# Altium PCB Driver Main Board-v1.0.PcbDoc (part 5 of 5)
Units mm, origin at the board's own origin, x right, y up, seen from the top; angles counter-clockwise.
Board outline 150 x 100 mm, 4 copper layers (Top Layer, Layer 1, Layer 2, Bottom Layer), stack 1.566 mm thick; 282 components, 222 nets, 936 pads, 397 vias.
Unrouted connection lines stored in the file: 249.
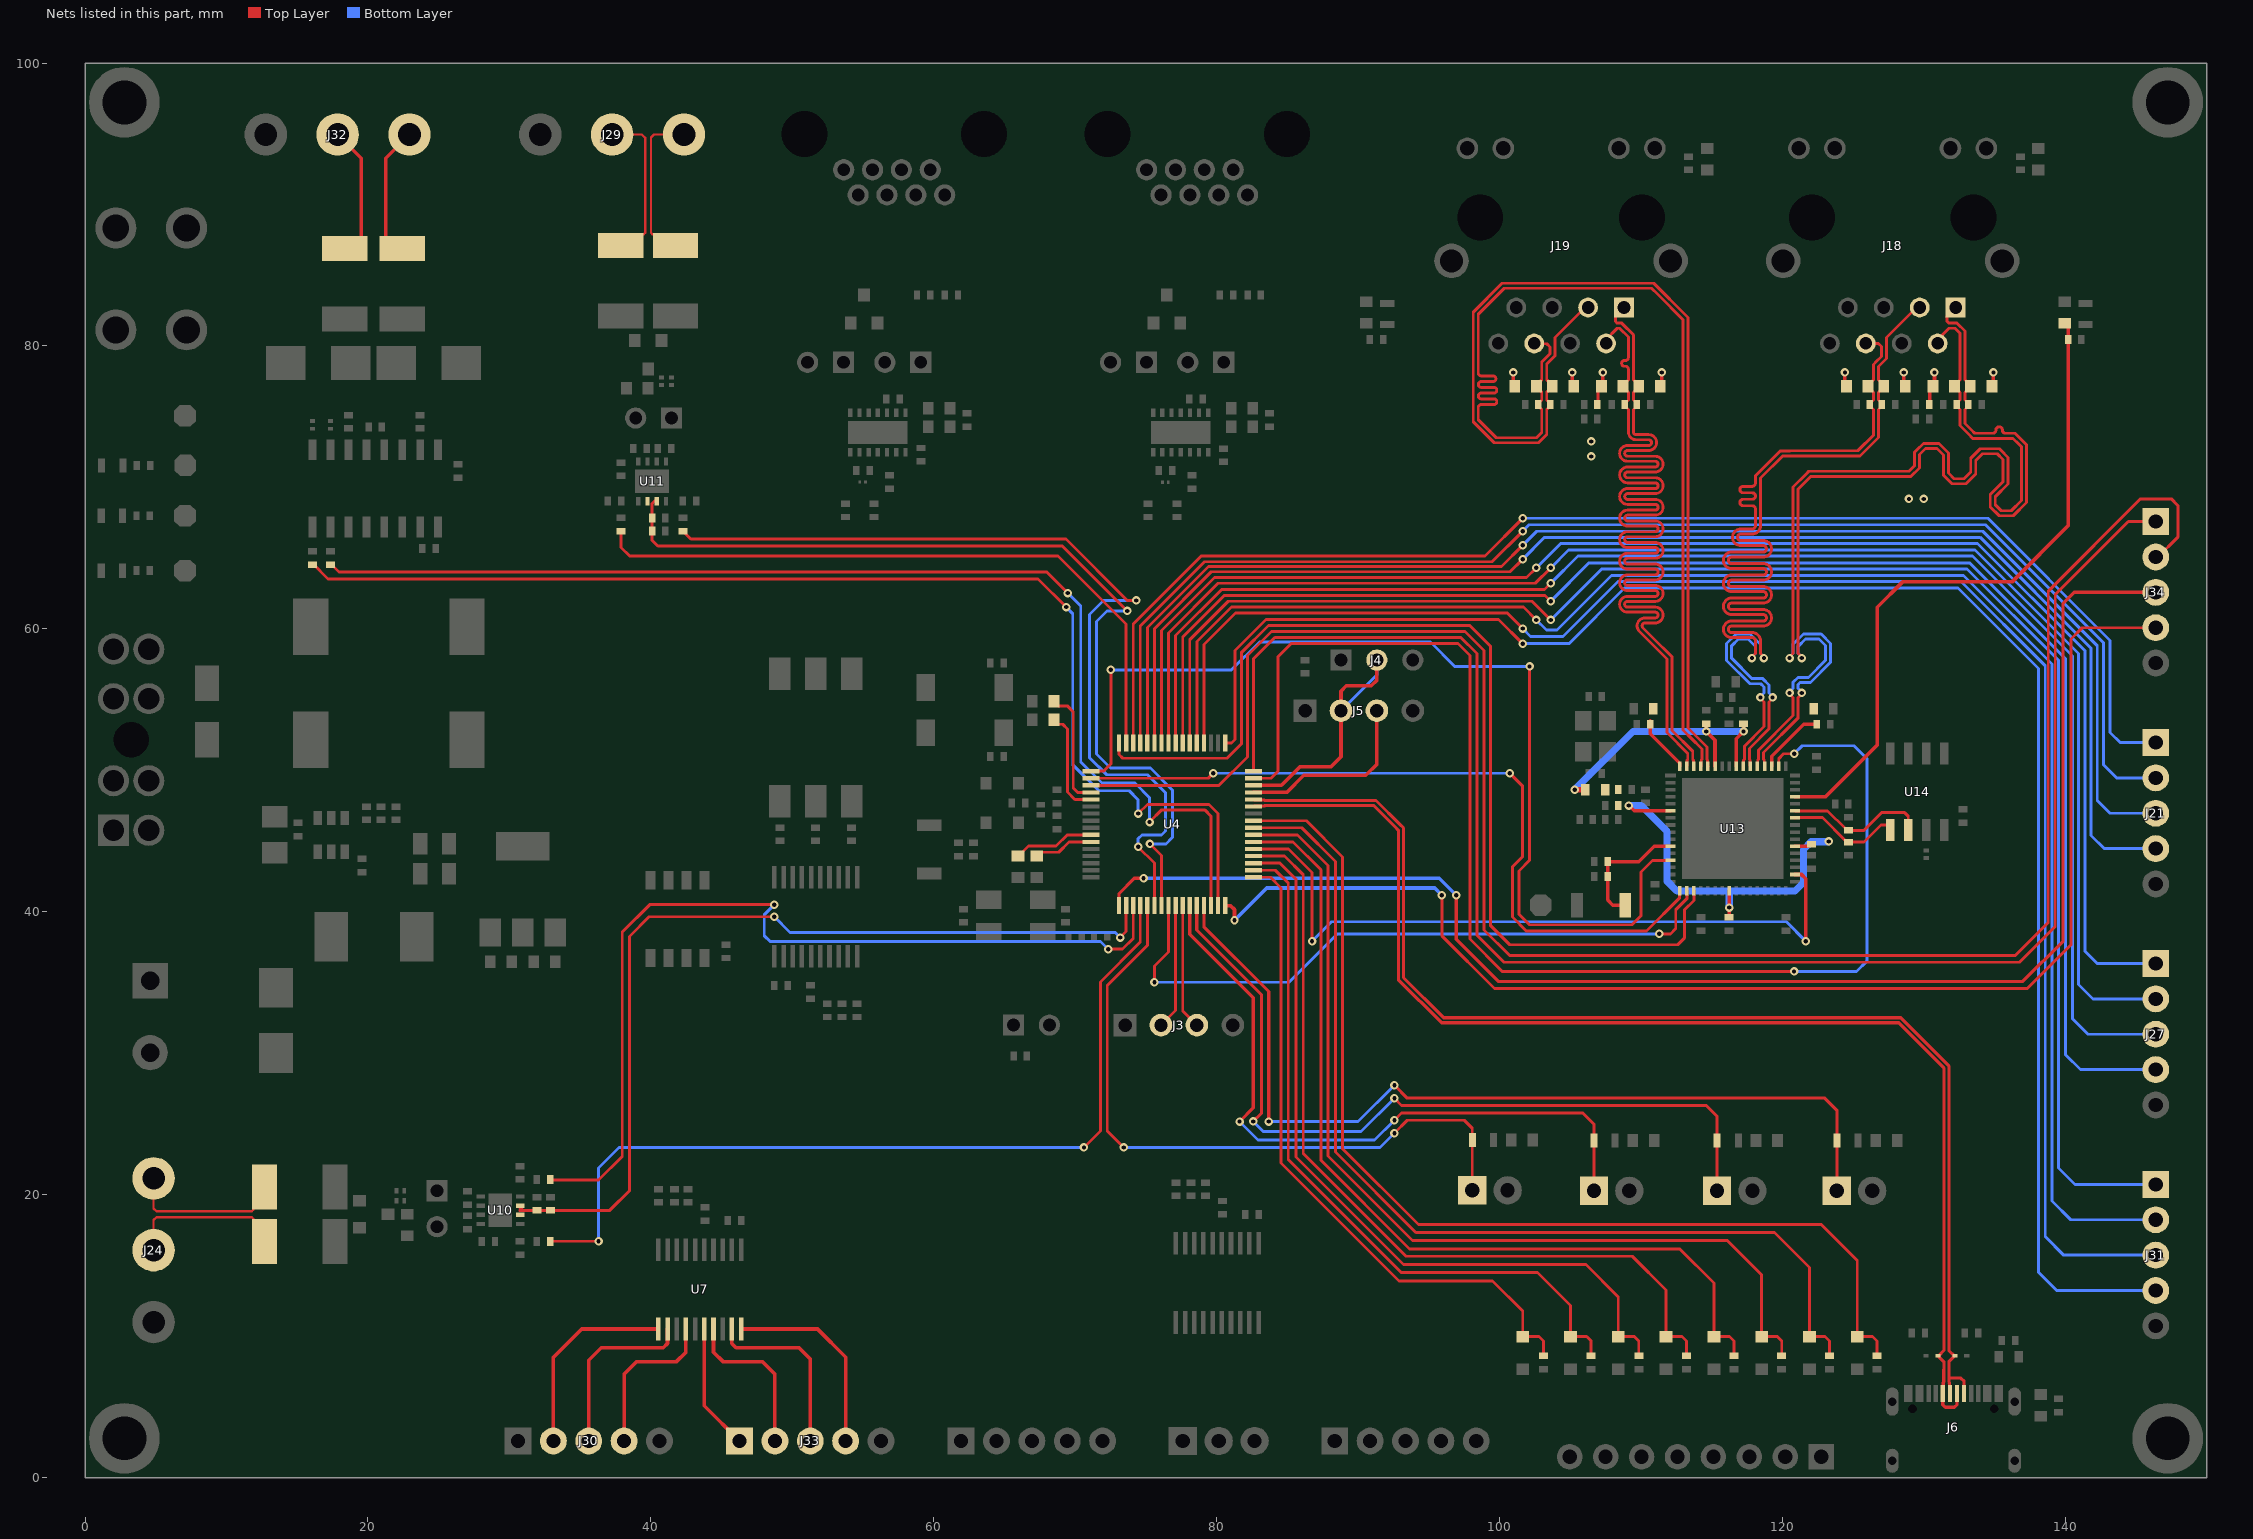
[diagram p5: the nets of this part, all layers, seen from the top]

## Via types
v1: diameter 0.6, hole 0.3, Top Layer to Bottom Layer, 397 vias

## Nets (pads, with @x,y where several pads share a name; then routed paths per layer and width w, separated by ;. In a path a pad name is that pad's centre, name@x,y a point inside that pad or via, vN(x,y) a via of type N, cw(c..) or ccw(c..) an arc to the next point about the centre after c; other vN are vias at no path point) (continued)
OUT3_2: J30.2 U7.11 | length 14.2
  Top Layer w0.254: J30.2@33.104,2.591 33.104,8.492 35.121,10.509 U7.11@40.526,10.509
OUT3_3: J30.3 U7.12 | length 12.8
  Top Layer w0.254: J30.3@35.604,2.591 35.604,8.299 36.497,9.192 40.882,9.192 41.176,9.486 U7.12@41.176,10.509
OUT3_4: J30.4 U7.14 | length 11.4
  Top Layer w0.254: J30.4@38.104,2.591 38.104,7.304 39.004,8.204 41.808,8.204 42.476,8.872 U7.14@42.476,10.509
OUT4_1: J33.1 U7.16 | length 9
  Top Layer w0.254: U7.16@43.776,10.509 43.776,5.084 J33.1@46.269,2.591
OUT4_2: J33.2 U7.17 | length 11.3
  Top Layer w0.254: U7.17@44.426,10.509 44.426,8.872 45.093,8.204 47.869,8.204 48.769,7.304 J33.2@48.769,2.591
OUT4_3: J33.3 U7.19 | length 12.8
  Top Layer w0.254: U7.19@45.726,10.509 45.726,9.486 46.02,9.192 50.468,9.192 51.269,8.392 J33.3@51.269,2.591
OUT4_4: J33.4 U7.20 | length 14.1
  Top Layer w0.254: U7.20@46.376,10.509 51.78,10.509 53.769,8.52 J33.4@53.769,2.591
PA8: D7.1 R37.1 U4.36 | length 59.3
  Top Layer w0.203: U4.36@82.594,43.939 84.8,43.939 86.115,42.624 86.115,22.924 93.389,15.65 109.373,15.65 111.765,13.259 D7.1@111.765,9.968 ; D7.1@111.775,9.968 112.885,9.968 113.203,9.65 R37.1@113.203,8.607
PB13: D4.1 R40.1 U4.33 | length 47.5
  Top Layer w0.203: U4.33@82.594,42.439 83.794,42.439 84.551,41.682 84.551,22.233 92.874,13.911 99.497,13.911 101.63,11.778 D4.1@101.63,9.968 ; D4.1@101.674,9.968 102.783,9.968 103.101,9.65 R40.1@103.101,8.607
PB14: D5.1 R39.1 U4.34 | length 51.4
  Top Layer w0.203: U4.34@82.594,42.939 84.139,42.939 85.051,42.028 85.051,22.496 93.043,14.504 102.683,14.504 105.008,12.178 D5.1@105.008,9.968 ; D5.1@105.041,9.968 106.151,9.968 106.468,9.65 R39.1@106.468,8.607
PB15: D6.1 R38.1 U4.35 | length 55.4
  Top Layer w0.203: U4.35@82.594,43.439 84.454,43.439 85.594,42.3 85.594,22.668 93.2,15.061 106.099,15.061 108.386,12.773 D6.1@108.386,9.968 ; D6.1@108.408,9.968 109.518,9.968 109.835,9.65 R38.1@109.835,8.607
PC6: D8.1 R36.1 U4.38 | length 63.9
  Top Layer w0.203: U4.38@82.594,44.939 85.387,44.939 87.361,42.966 87.361,22.433 93.622,16.171 112.728,16.171 115.143,13.756 D8.1@115.143,9.968 116.253,9.968 116.57,9.65 R36.1@116.57,8.607
PC7: D9.1 R35.1 U4.39 | length 67.8
  Top Layer w0.203: U4.39@82.594,45.439 85.703,45.439 87.871,43.271 87.871,22.732 93.845,16.758 116.089,16.758 118.521,14.326 D9.1@118.521,9.968 119.62,9.968 119.937,9.65 R35.1@119.937,8.607
PC14-OSC32_IN: R7.2 U4.4 | length 8.4
  Top Layer w0.203: R7.2@68.488,54.876 68.488,54.838 68.767,54.559 69.435,54.559 69.859,54.134 69.859,48.75 70.171,48.439 U4.4@71.095,48.439
PC15-OSC32_OUT: R8.2 U4.5 | length 7.6
  Top Layer w0.203: R8.2@68.488,53.581 68.488,53.533 68.767,53.254 69.109,53.254 69.444,52.919 69.444,48.462 69.967,47.939 U4.5@71.095,47.939
PD8: D10.1 R34.1 U4.40 | length 71.7
  Top Layer w0.203: U4.40@82.594,45.939 86.01,45.939 88.385,43.564 88.385,23.015 94.073,17.327 119.435,17.327 121.899,14.862 D10.1@121.899,9.968 122.987,9.968 123.305,9.65 R34.1@123.305,8.607
PD9: D12.1 R33.1 U4.41 | length 75.6
  Top Layer w0.203: U4.41@82.594,46.439 86.333,46.439 88.894,43.878 88.894,23.253 94.263,17.884 122.734,17.884 125.277,15.34 D12.1@125.277,9.968 126.355,9.968 126.672,9.65 R33.1@126.672,8.607
PF0-OSC_IN: R9.2 U4.10 | length 5.8
  Top Layer w0.203: R9.2@65.927,43.939 65.991,43.939 66.692,44.64 68.627,44.64 69.426,45.439 U4.10@71.095,45.439
PF1-OSC_OUT: R10.2 U4.11 | length 4.2
  Top Layer w0.203: R10.2@67.274,43.939 67.541,44.207 68.83,44.207 69.562,44.939 U4.11@71.095,44.939
PWM1_1: J21.1 U4.62 | length 94.2
  Top Layer w0.203: U4.62@74.094,51.939 74.094,60.342 78.903,65.151 98.958,65.151 v1(101.625,67.818)
  Bottom Layer w0.203: v1(101.625,67.818) 134.525,67.818 143.154,59.189 143.154,52.675 143.866,51.963 J21.1@146.38,51.963
PWM1_2: J21.2 U4.61 | length 95.5
  Top Layer w0.203: U4.61@74.595,51.939 74.595,60.205 79.134,64.745 99.466,64.745 v1(101.625,66.904)
  Bottom Layer w0.203: v1(101.625,66.904) 102.083,67.361 134.336,67.361 142.697,58.999 142.697,50.387 143.62,49.463 J21.2@146.38,49.463
PWM1_3: J21.3 U4.60 | length 96.9
  Top Layer w0.203: U4.60@75.094,51.939 75.094,60.095 79.414,64.414 100.127,64.414 v1(101.625,65.913)
  Bottom Layer w0.203: v1(101.625,65.913) 102.616,66.904 134.146,66.904 142.24,58.81 142.24,47.862 143.138,46.963 J21.3@146.38,46.963
PWM1_4: J21.4 U4.59 | length 98.4
  Top Layer w0.203: U4.59@75.595,51.939 75.595,60.011 79.617,64.033 100.736,64.033 v1(101.625,64.922)
  Bottom Layer w0.203: v1(101.625,64.922) 103.175,66.472 133.968,66.472 141.808,58.631 141.808,45.388 142.733,44.463 J21.4@146.38,44.463
PWM2_1: J27.1 U4.58 | length 105.5
  Top Layer w0.203: U4.58@76.094,51.939 76.094,59.876 79.845,63.627 101.905,63.627 v1(102.591,64.313)
  Bottom Layer w0.203: v1(102.591,64.313) 104.318,66.04 133.789,66.04 141.376,58.452 141.376,37.213 142.245,36.345 J27.1@146.38,36.345
PWM2_2: J27.2 U4.57 | length 106.8
  Top Layer w0.203: U4.57@76.595,51.939 76.595,59.716 80.099,63.221 102.514,63.221 v1(103.607,64.313)
  Bottom Layer w0.203: v1(103.607,64.313) 104.877,65.583 133.599,65.583 140.919,58.263 140.919,34.858 141.933,33.845 J27.2@146.38,33.845
PWM2_3: J27.3 U4.56 | length 108.2
  Top Layer w0.203: U4.56@77.094,51.939 77.094,59.53 80.353,62.789 103.175,62.789 v1(103.607,63.221)
  Bottom Layer w0.203: v1(103.607,63.221) 105.537,65.151 133.421,65.151 140.487,58.084 140.487,32.436 141.578,31.345 J27.3@146.38,31.345
PWM2_4: J27.4 U4.55 | length 110
  Top Layer w0.203: U4.55@77.595,51.939 77.595,59.42 80.531,62.357 103.2,62.357 v1(103.607,61.951)
  Bottom Layer w0.203: v1(103.607,61.951) 106.324,64.668 133.221,64.668 140.005,57.884 140.005,29.896 141.056,28.845 J27.4@146.38,28.845
PWM3_1: J31.1 U4.54 | length 117.8
  Top Layer w0.203: U4.54@78.094,51.939 78.094,59.234 80.811,61.951 102.286,61.951 v1(103.607,60.63)
  Bottom Layer w0.203: v1(103.607,60.63) 107.213,64.237 133.042,64.237 139.501,57.777 139.501,21.893 140.668,20.726 J31.1@146.38,20.726
PWM3_2: J31.2 U4.53 | length 119.3
  Top Layer w0.203: U4.53@78.595,51.939 78.595,59.099 81.039,61.544 101.676,61.544 v1(102.591,60.63)
  Bottom Layer w0.203: v1(102.591,60.63) 103.302,59.919 104.064,59.919 107.914,63.769 132.795,63.769 139.04,57.525 139.04,19.55 140.364,18.226 J31.2@146.38,18.226
PWM3_3: J31.3 U4.52 | length 120.8
  Top Layer w0.203: U4.52@79.094,51.939 79.094,58.888 81.319,61.112 100.533,61.112 v1(101.625,60.02)
  Bottom Layer w0.203: v1(101.625,60.02) 102.184,59.461 104.483,59.461 108.359,63.337 132.616,63.337 138.565,57.389 138.565,17.036 139.874,15.726 J31.3@146.38,15.726
PWM3_4: J31.4 U4.49 | length 121
  Top Layer w0.203: U4.49@80.595,51.939 81.047,51.939 81.295,52.187 81.295,58.466 83.491,60.662 99.917,60.662 v1(101.625,58.953)
  Bottom Layer w0.203: v1(101.625,58.953) 104.9,58.953 108.829,62.883 132.405,62.883 138.089,57.199 138.089,14.518 139.38,13.226 J31.4@146.38,13.226
PWM4_1: J34.1 U4.48 | length 120.2
  Top Layer w0.203: U4.48@82.594,49.939 82.594,57.888 84.105,59.399 97.254,59.399 98.4,58.253 98.4,38.341 100.306,36.435 136.744,36.435 139.277,38.968 139.277,62.419 144.44,67.582 J34.1@146.38,67.582
PWM4_2: J34.2 U4.3 | length 138.3
  Top Layer w0.203: U4.3@71.095,48.939 80.155,48.939 82.169,50.953 82.169,58.108 83.865,59.804 97.558,59.804 98.896,58.466 98.896,38.713 100.686,36.922 136.461,36.922 138.775,39.236 138.775,62.663 145.304,69.193 147.47,69.193 147.94,68.723 147.94,66.482 146.54,65.082 J34.2@146.38,65.082
PWM4_3: J34.3 U4.17 | length 104.8
  Top Layer w0.229: U4.17@73.094,40.439 73.094,41.294 74.168,42.367 v1(74.828,42.367) ; v1(96.926,41.173) 96.926,38.049 99.899,35.076 136.981,35.076 139.827,37.922 139.827,61.798 140.611,62.582 J34.3@146.38,62.582
  Bottom Layer w0.229: v1(74.828,42.367) 95.732,42.367 v1(96.926,41.173)
PWM4_4: J34.4 U4.32 | length 95.5
  Top Layer w0.203: v1(95.91,41.173) 95.91,38.311 99.645,34.576 137.296,34.576 140.386,37.667 140.386,59.284 141.184,60.082 J34.4@146.38,60.082
  Top Layer w0.254: U4.32@80.595,40.439 80.599,40.435 80.977,40.435 81.255,40.157 v1(81.255,39.395)
  Bottom Layer w0.254: v1(81.255,39.395) 83.541,41.682 95.402,41.682 v1(95.91,41.173)
RE/DE/RS485/T: R66.1 R68.1 U4.18 U10.2 U10.3 | length 65
  Top Layer w0.203: 30.725,18.896 30.943,18.896 31.93,18.896 R66.1@31.938,18.888 ; R66.1@31.945,18.896 R68.1@32.887,18.896 37.094,18.896 38.478,20.281 38.478,38.256 39.871,39.648 v1@48.726,39.648 ; v1(73.179,38.181) 73.595,38.597 U4.18@73.595,40.439
  Top Layer w0.254: U10.3@30.758,19.226 30.758,19.082 30.943,18.896 ; R66.1@31.93,18.896 R66.1@31.945,18.896
  Bottom Layer w0.203: v1(48.726,39.647) 49.842,38.532 52.252,38.532 72.828,38.532 v1(73.179,38.181)
RE/DE/RS485/T-2: R67.1 R69.1 U4.23 U11.2 U11.3 | length 66.8
  Top Layer w0.203: U11.3@40.41,69.031 40.265,69.031 40.08,68.845 R67.1@40.08,67.843 R69.1@40.08,66.902 40.08,66.266 40.49,65.856 69.083,65.856 v1(73.674,61.265) ; v1(75.273,44.795) 76.094,43.974 U4.23@76.094,40.439
  Bottom Layer w0.203: v1(73.674,61.265) 72.249,61.265 71.495,60.511 71.495,51.162 72.488,50.168 75.308,50.168 76.86,48.616 76.86,45.246 76.41,44.795 v1(75.273,44.795)
RS232_RX: F5.1 J32.1 | length 9.5
  Top Layer w0.254: F5.1@22.427,86.893 22.021,86.893 21.258,87.656 21.258,93.269 J32.1@22.935,94.945
RS232_TX: F6.1 J32.2 | length 9.5
  Top Layer w0.254: J32.2@17.855,94.945 19.531,93.269 19.531,87.656 18.768,86.893 F6.1@18.363,86.893
RS485-2_N: F3.2 J29.2 | length 11.2
  Top Layer w0.165: J29.2@37.26,94.945 39.358,94.945 39.591,94.713 39.591,88.001 39.494,87.904 38.677,87.904 F3.2@37.87,87.097
RS485-2_P: F4.2 J29.1 | length 11.2
  Top Layer w0.165: F4.2@41.731,87.097 40.923,87.904 40.107,87.904 40.01,88.001 40.01,94.727 40.228,94.945 J29.1@42.34,94.945
RS485_N: F1.2 J24.2 | length 11.3
  Top Layer w0.165: J24.2@4.844,16.076 4.844,18.203 5.047,18.407 11.788,18.407 11.885,18.31 11.885,17.493 F1.2@12.692,16.686
RS485_P: F2.2 J24.1 | length 11.2
  Top Layer w0.165: J24.1@4.844,21.156 4.844,19.031 5.049,18.826 11.788,18.826 11.885,18.923 11.885,19.739 F2.2@12.692,20.547
RST#: C43.2 R92.2 SW3.2 U13.11 | length 9
  Top Layer w0.254: SW3.2@108.865,40.468 108.004,40.468 107.635,40.837 C43.2@107.635,42.5 R92.2@107.635,43.542 109.84,43.542 110.934,44.635 U13.11@112.074,44.635
RUNLED: R106.1 R107.2 U13.45 | length 47.4
  Top Layer w0.254: U13.45@120.874,48.135 123.038,48.135 126.695,51.792 126.695,61.533 128.479,63.317 136.218,63.317 140.182,67.281 R106.1@140.182,80.447 140.182,81.357 R107.2@139.94,81.598
RXA_N: C57.2 J18.6 R93.1 U13.54 | length 72.3
  Top Layer w0.203: U13.54@117.724,50.285 117.7,50.309 117.7,50.715 117.652,50.764 117.652,51.554 119.04,52.942 119.04,54.835 119.289,55.084 v1(119.289,55.153) ; v1(117.831,57.937) 117.831,58.006 118.079,58.255 118.079,58.877 118.079,59.157 ccw(c117.851,59.157) 117.851,59.385 116.398,59.385 cw(c116.398,59.969) 116.398,60.554 118.632,60.554 ccw(c118.632,60.782) 118.632,61.011 116.398,61.011 cw(c116.398,61.595) 116.398,62.179 118.632,62.179 ccw(c118.632,62.408) 118.632,62.636 116.398,62.636 cw(c116.398,63.221) 116.398,63.805 118.632,63.805 ccw(c118.632,64.033) 118.632,64.262 116.398,64.262 cw(c116.398,64.846) 116.398,65.43 118.632,65.43 ccw(c118.632,65.659) 118.632,65.888 117.042,65.888 cw(c117.042,66.472) 117.042,67.056 117.851,67.056 ccw(c117.851,67.285) 118.079,67.285 118.079,68.019 118.079,68.374 118.079,68.476 ccw(c117.851,68.476) 117.851,68.704 117.211,68.704 cw(c117.211,68.933) 117.211,69.162 117.851,69.162 ccw(c117.851,69.39) 117.851,69.619 117.211,69.619 cw(c117.211,69.847) 117.211,70.076 117.851,70.076 ccw(c117.851,70.305) 118.079,70.305 118.079,70.808 118.094,70.822 119.858,72.586 120.068,72.586 120.527,72.587 125.23,72.587 125.316,72.587 126.415,73.686 126.415,75.514 126.173,75.755 C57.2@126.173,75.844 126.173,75.933 126.415,76.175 126.415,76.72 126.033,77.102 R93.1@126.033,77.165 126.033,77.229 126.415,77.61 126.415,78.689 126.623,78.898 126.986,79.261 126.986,79.953 126.766,80.173 125.885,80.173 J18.6@125.882,80.176
  Bottom Layer w0.203: v1(117.831,57.937) 117.831,58.006 118.08,58.255 118.08,58.755 117.551,59.284 116.877,59.284 116.401,58.807 116.401,57.922 117.843,56.479 118.6,56.479 119.04,56.04 119.04,55.47 119.289,55.221 v1(119.289,55.153)
RXA_P: C59.2 J18.3 R95.1 U13.55 | length 72.6
  Top Layer w0.203: U13.55@117.224,50.285 117.247,50.309 117.247,50.715 117.296,50.764 117.296,51.701 118.684,53.09 118.684,54.835 118.435,55.084 v1(118.435,55.153) ; v1(118.685,57.937) 118.685,58.005 118.435,58.255 118.435,58.877 118.435,59.157 ccw(c117.851,59.157) 117.851,59.741 116.398,59.741 cw(c116.398,59.969) 116.398,60.198 118.632,60.198 ccw(c118.632,60.782) 118.632,61.366 116.398,61.366 cw(c116.398,61.595) 116.398,61.824 118.632,61.824 ccw(c118.632,62.408) 118.632,62.992 116.398,62.992 cw(c116.398,63.221) 116.398,63.449 118.632,63.449 ccw(c118.632,64.033) 118.632,64.618 116.398,64.618 cw(c116.398,64.846) 116.398,65.075 118.632,65.075 ccw(c118.632,65.659) 118.632,66.243 117.042,66.243 cw(c117.042,66.472) 117.042,66.7 117.851,66.7 ccw(c117.851,67.285) 118.435,67.285 118.435,68.019 118.435,70.66 120.006,72.231 125.463,72.231 126.77,73.538 126.77,75.514 127.012,75.755 C59.2@127.012,75.844 127.012,75.933 126.77,76.175 126.77,76.72 127.152,77.102 R95.1@127.152,77.165 127.152,77.229 126.77,77.61 126.77,78.542 127.342,79.114 127.342,80.588 129.47,82.716 J18.3@129.692,82.716
  Bottom Layer w0.203: v1(118.435,55.153) 118.435,55.221 118.684,55.47 118.684,55.893 118.453,56.124 117.695,56.124 116.045,57.774 116.045,58.955 116.729,59.639 117.698,59.639 118.435,58.902 118.435,58.255 118.685,58.006 v1(118.685,57.937)
RXB_N: C58.2 J19.6 R94.1 U13.61 | length 75.6
  Top Layer w0.203: J19.6@102.442,80.176 102.467,80.151 103.327,80.151 103.558,79.92 103.558,79.448 103.183,79.074 102.975,78.865 102.975,77.61 102.594,77.229 R94.1@102.594,77.165 102.594,77.102 102.975,76.72 102.975,76.175 102.733,75.933 C58.2@102.733,75.844 102.733,75.755 102.975,75.514 102.975,73.891 102.594,73.51 99.76,73.51 98.484,74.786 98.484,75.143 98.484,75.651 cw(c98.687,75.651) 98.687,75.854 99.593,75.854 ccw(c99.593,76.057) 99.593,76.26 98.687,76.26 cw(c98.687,76.464) 98.687,76.667 99.593,76.667 ccw(c99.593,76.87) 99.593,77.073 98.687,77.073 cw(c98.687,77.276) 98.687,77.48 99.528,77.48 ccw(c99.528,77.683) 99.528,77.886 98.687,77.886 cw(c98.687,78.089) 98.484,78.089 98.484,79.102 98.484,82.236 100.322,84.074 110.744,84.074 111.15,83.668 112.964,81.854 112.964,52.842 113.068,52.738 113.504,52.301 114.296,51.509 114.296,50.764 114.247,50.715 114.247,50.309 U13.61@114.224,50.285
RXB_P: C60.2 J19.3 R96.1 U13.60 | length 75.6
  Top Layer w0.203: J19.3@106.252,82.716 106.03,82.716 103.913,80.599 103.913,79.301 103.331,78.718 103.33,77.61 103.712,77.229 R96.1@103.712,77.165 ; U13.60@114.724,50.285 114.7,50.309 114.7,50.715 114.652,50.764 114.652,51.657 113.319,52.989 113.319,82.002 113.215,82.106 110.891,84.43 100.174,84.43 98.129,82.384 98.129,74.638 99.612,73.155 102.741,73.155 103.33,73.744 103.33,75.514 C60.2@103.572,75.755 ; 103.33,76.175 103.33,76.72 ; 103.33,76.175 C60.2@103.572,75.933 ; 103.33,76.175 103.33,76.72 ; 103.33,76.175 C60.2@103.572,75.933 ; 103.33,76.72 R96.1@103.712,77.102 ; 103.33,76.72 R96.1@103.712,77.102 ; C60.2@103.572,75.755 C60.2@103.572,75.844 ; C60.2@103.572,75.755 C60.2@103.572,75.844 ; C60.2@103.572,75.844 C60.2@103.572,75.933 ; C60.2@103.572,75.844 C60.2@103.572,75.933 ; R96.1@103.712,77.102 R96.1@103.712,77.165 ; R96.1@103.712,77.102 R96.1@103.712,77.165
RXD/RS232: R85.2 U4.31 | length 85.1
  Top Layer w0.203: R85.2@16.139,64.565 17.179,63.525 67.369,63.525 v1(69.356,61.538) ; v1(74.445,46.939) 75.094,47.589 79.445,47.589 80.094,46.939 U4.31@80.094,40.439
  Bottom Layer w0.203: v1(69.356,61.538) 69.825,61.07 69.825,50.395 71.665,48.554 73.812,48.554 74.445,47.922 v1(74.445,46.939)
RXD/RS485: R61.1 U4.19 | length 64.8
  Top Layer w0.203: R61.1@32.885,21.08 32.934,21.031 36.297,21.031 37.973,22.708 37.973,38.561 39.914,40.502 v1(48.726,40.502) ; v1(72.322,37.36) 73.339,37.36 74.094,38.116 U4.19@74.094,40.439
  Bottom Layer w0.203: v1(48.726,40.502) 48.017,39.793 48.017,38.311 48.435,37.892 51.244,37.892 71.79,37.892 v1(72.322,37.36)
RXD/RS485-2: R63.1 U4.22 | length 64.4
  Top Layer w0.203: R63.1@42.264,66.904 42.823,66.345 69.336,66.345 73.674,62.007 v1(74.314,62.007) ; v1(74.445,44.589) 75.595,43.439 U4.22@75.595,40.439
  Bottom Layer w0.203: v1(74.314,62.007) 72.002,62.007 71.012,61.018 71.012,50.892 72.219,49.686 75.108,49.686 76.378,48.416 76.378,45.718 76.094,45.435 74.716,45.435 74.445,45.163 v1(74.445,44.589)
SCL: R87.1 U13.43 U14.6 | length 10.2
  Top Layer w0.203: U13.43@120.874,47.135 123.183,47.135 124.436,45.883 124.526,45.883 R87.1@124.653,45.756 125.741,45.756 126.992,47.006 128.63,47.006 128.882,46.754 U14.6@128.882,45.782
SDA: R86.1 U13.42 U14.5 | length 8.3
  Top Layer w0.203: U13.42@120.874,46.635 120.895,46.656 122.81,46.656 124.41,45.056 124.526,45.056 R86.1@124.653,44.929 ; R86.1@124.564,44.929 125.746,44.929 126.96,46.143 127.404,46.143 127.612,45.935 U14.5@127.612,45.782
SPI3_CS: U4.47 U13.50 | length 95.5
  Top Layer w0.203: U4.47@82.594,49.439 83.828,49.439 84.328,49.939 84.328,58.026 85.262,58.96 97.048,58.96 97.892,58.117 97.892,38.076 100.186,35.782 v1(120.807,35.782) ; U13.50@119.724,50.285 119.724,50.821 120.073,51.17 v1(120.817,51.17)
  Bottom Layer w0.203: v1(120.807,35.782) 125.228,35.782 125.955,36.509 125.955,50.829 125.044,51.74 121.387,51.74 v1(120.817,51.17)
SPI3_MISO: U4.1 U13.13 | length 72
  Top Layer w0.203: U4.1@71.095,49.939 72.001,49.939 72.513,50.451 v1(72.513,57.105) ; v1(102.115,57.346) 102.115,43.637 101.371,42.894 101.371,39.827 102.115,39.084 109.352,39.084 109.985,39.717 109.985,42.824 110.796,43.635 U13.13@112.074,43.635
  Bottom Layer w0.203: v1(72.513,57.105) 81.051,57.105 83.015,59.068 95.104,59.068 96.825,57.346 v1(102.115,57.346)
SPI3_MOSI: U4.2 U13.17 | length 54.3
  Top Layer w0.203: U4.2@71.095,49.439 79.394,49.439 v1(79.745,49.789) ; v1(100.711,49.789) 101.627,48.874 101.627,43.904 100.907,43.184 100.907,39.621 101.882,38.646 110.382,38.646 112.724,40.987 U13.17@112.724,41.485 ; U13.17@112.718,41.48 U13.17@112.724,41.485 ; U13.17@112.729,41.491 U13.17@112.724,41.485
  Bottom Layer w0.203: v1(79.745,49.789) v1(100.711,49.789)
SPI3_SCK: U4.64 U13.19 | length 73.3
  Top Layer w0.203: U4.64@73.094,51.939 73.094,51.121 73.36,50.855 80.724,50.855 81.737,51.869 81.737,58.314 83.652,60.229 97.886,60.229 99.364,58.751 99.364,39.017 100.714,37.668 112.585,37.668 113.052,38.135 113.052,40.123 113.729,40.8 U13.19@113.729,41.491
SW_CLK/BOOT0: J4.2 J5.2 U4.46 | length 20.5
  Top Layer w0.254: U4.46@82.594,48.939 84.571,48.939 85.872,50.241 88.066,50.241 88.782,50.957 J5.2@88.782,54.216 88.782,55.587 89.163,55.968 90.923,55.968 91.322,56.368 J4.2@91.322,57.695
  Bottom Layer w0.203: J5.2@88.782,54.216 91.322,56.756 J4.2@91.322,57.797
SW_DIO: J5.3 U4.45 | length 13.3
  Top Layer w0.254: U4.45@82.594,48.439 84.942,48.439 86.149,49.646 90.542,49.646 91.322,50.426 J5.3@91.322,54.216
SYNC0: U4.37 U13.34 | length 51.9
  Top Layer w0.203: U4.37@82.594,44.439 85.071,44.439 86.739,42.771 v1(86.739,37.922)
  Top Layer w0.254: U13.34@120.874,42.635 121.33,42.635 121.631,42.334 ; U13.34@120.879,42.641 121.336,42.641 121.637,42.34 v1@121.637,37.922
  Bottom Layer w0.203: v1(86.739,37.922) 88.112,39.296 120.267,39.296 v1(121.641,37.922)
SYNC1: U4.24 U13.18 | length 47.3
  Top Layer w0.203: v1(75.595,35.023) 75.595,36.164 76.595,37.164 U4.24@76.595,40.439 ; v1(111.284,38.44) 112.074,38.44 112.451,38.817 112.451,40.145 113.229,40.923 U13.18@113.229,41.491
  Bottom Layer w0.203: v1(75.595,35.023) 85.103,35.023 88.52,38.44 v1(111.284,38.44)
TXA_N: C61.2 J18.2 R98.1 U13.52 | length 72.6
  Top Layer w0.203: U13.52@118.724,50.285 118.7,50.309 118.7,50.715 118.652,50.764 118.652,51.268 121.101,53.717 121.101,55.153 121.35,55.402 v1(121.35,55.47) ; v1(120.496,57.937) 120.496,58.006 120.745,58.255 120.745,70.032 121.643,70.93 121.852,71.138 128.928,71.138 129.313,71.523 129.313,72.462 129.521,72.67 129.952,73.101 131.06,73.101 131.523,72.638 131.731,72.429 131.731,71.007 132.124,70.614 132.815,70.614 133.298,71.096 133.298,72.055 133.975,72.732 135.325,72.732 135.429,72.628 135.939,72.118 135.939,70.247 135.036,69.344 135.036,68.772 135.457,68.351 136.163,68.351 136.882,69.071 136.882,72.872 136.691,73.063 136.286,73.468 133.441,73.468 133.11,73.8 132.536,74.374 132.536,75.514 132.295,75.755 C61.2@132.295,75.844 132.295,75.933 132.536,76.175 132.536,76.721 132.155,77.102 R98.1@132.155,77.165 132.155,77.229 132.536,77.61 132.536,80.9 132.183,81.253 131.753,81.253 130.962,80.461 J18.2@130.962,80.176
  Bottom Layer w0.203: v1(120.496,57.937) 120.496,58.006 120.745,58.255 120.745,58.917 121.468,59.639 122.728,59.639 123.393,58.974 123.393,57.638 121.97,56.215 121.241,56.215 121.101,56.075 121.101,55.788 121.35,55.538 v1(121.35,55.47)
TXA_P: C63.2 J18.1 R100.1 U13.53 | length 72.5
  Top Layer w0.203: U13.53@118.224,50.285 118.247,50.309 118.247,50.715 118.296,50.764 118.296,51.415 120.745,53.865 120.745,55.153 120.496,55.402 v1(120.496,55.47) ; v1(121.35,57.937) 121.35,58.006 121.101,58.255 121.101,69.885 121.999,70.783 129.075,70.783 129.668,71.376 129.668,72.314 ; 129.668,72.315 130.099,72.746 130.912,72.746 131.376,72.282 131.376,70.86 131.977,70.258 132.963,70.258 133.653,70.949 133.653,71.907 134.122,72.376 135.177,72.376 135.583,71.971 135.583,70.394 134.681,69.491 134.681,68.625 135.31,67.996 136.31,67.996 137.238,68.923 137.238,73.019 136.433,73.824 136.322,73.824 135.763,73.824 cw(c135.763,74.052) 135.535,74.052 135.535,74.061 ccw(c135.306,74.061) 135.078,74.061 135.078,74.052 cw(c134.849,74.052) 134.849,73.824 134.309,73.824 133.589,73.824 133.361,74.051 132.891,74.521 132.891,75.514 133.133,75.755 C63.2@133.133,75.844 133.133,75.933 132.891,76.175 132.891,76.721 133.272,77.102 R100.1@133.272,77.165 133.272,77.229 132.891,77.61 132.891,81.047 132.33,81.608 131.753,81.608 131.634,81.727 131.634,82.119 J18.1@132.232,82.716
  Bottom Layer w0.203: v1(120.496,55.47) 120.496,55.538 120.745,55.788 120.745,56.222 121.094,56.571 121.823,56.571 123.038,57.785 123.038,58.826 122.58,59.284 121.615,59.284 121.101,58.769 121.101,58.255 121.35,58.006 v1(121.35,57.937)
TXB_N: C62.2 J19.2 R99.1 U13.63 | length 75.7
  Top Layer w0.203: J19.2@107.522,80.176 107.522,80.461 108.313,81.253 108.482,81.253 109.096,80.639 109.096,79.682 109.096,79.174 cw(c108.893,79.174) 108.893,78.971 108.823,78.971 ccw(c108.823,78.768) 108.823,78.564 108.893,78.564 cw(c108.893,78.361) 109.096,78.361 109.096,77.87 109.096,77.61 108.715,77.229 R99.1@108.715,77.165 108.715,77.102 109.096,76.721 109.096,76.175 108.855,75.933 C62.2@108.855,75.844 108.855,75.755 109.096,75.514 109.096,75.508 109.096,73.93 ccw(c109.655,73.93) 109.655,73.372 110.533,73.372 cw(c110.533,73.168) 110.736,73.168 cw(c110.533,73.168) 110.533,72.965 109.039,72.965 ccw(c109.039,72.406) 108.48,72.406 ccw(c109.039,72.406) 109.039,71.848 110.994,71.848 cw(c110.994,71.644) 111.197,71.644 cw(c110.994,71.644) 110.994,71.441 109.039,71.441 ccw(c109.039,70.882) 108.48,70.882 ccw(c109.039,70.882) 109.039,70.324 110.994,70.324 cw(c110.994,70.12) 111.197,70.12 cw(c110.994,70.12) 110.994,69.917 109.039,69.917 ccw(c109.039,69.358) 108.48,69.358 ccw(c109.039,69.358) 109.039,68.8 110.994,68.8 cw(c110.994,68.596) 111.197,68.596 cw(c110.994,68.596) 110.994,68.393 109.039,68.393 ccw(c109.039,67.834) 108.48,67.834 ccw(c109.039,67.834) 109.039,67.276 110.994,67.276 cw(c110.994,67.072) 111.197,67.072 cw(c110.994,67.072) 110.994,66.869 109.039,66.869 ccw(c109.039,66.31) 108.48,66.31 ccw(c109.039,66.31) 109.039,65.752 110.994,65.752 cw(c110.994,65.548) 111.197,65.548 cw(c110.994,65.548) 110.994,65.345 109.039,65.345 ccw(c109.039,64.786) 108.48,64.786 ccw(c109.039,64.786) 109.039,64.228 110.994,64.228 cw(c110.994,64.025) 111.197,64.025 cw(c110.994,64.024) 110.994,63.821 109.039,63.821 ccw(c109.039,63.263) 108.48,63.263 ccw(c109.039,63.263) 109.039,62.704 110.994,62.704 cw(c110.994,62.501) 111.197,62.501 cw(c110.994,62.501) 110.994,62.297 109.039,62.297 ccw(c109.039,61.739) 108.48,61.739 ccw(c109.039,61.739) 109.039,61.18 110.994,61.18 cw(c110.994,60.977) 111.197,60.977 cw(c110.994,60.977) 110.994,60.773 110.273,60.773 ccw(c110.273,60.215) 109.879,59.818 110.334,59.364 111.82,57.877 111.82,52.675 113.296,51.2 113.296,50.764 113.247,50.715 113.247,50.309 U13.63@113.224,50.285
TXB_P: C64.2 J19.1 R101.1 U13.62 | length 75.7
  Top Layer w0.203: J19.1@108.792,82.716 108.194,82.119 108.194,81.727 108.313,81.608 108.629,81.608 109.452,80.786 109.452,77.61 109.833,77.229 R101.1@109.833,77.165 109.833,77.102 109.452,76.721 109.452,76.175 109.693,75.933 C64.2@109.693,75.844 109.693,75.755 109.452,75.514 109.452,75.508 109.452,73.93 ccw(c109.655,73.93) 109.655,73.727 110.533,73.727 cw(c110.533,73.168) 111.091,73.168 cw(c110.533,73.168) 110.533,72.61 109.039,72.61 ccw(c109.039,72.406) 108.836,72.406 ccw(c109.039,72.406) 109.039,72.203 110.994,72.203 cw(c110.994,71.644) 111.553,71.644 cw(c110.994,71.644) 110.994,71.086 109.039,71.086 ccw(c109.039,70.882) 108.836,70.882 ccw(c109.039,70.882) 109.039,70.679 110.994,70.679 cw(c110.994,70.12) 111.553,70.12 cw(c110.994,70.12) 110.994,69.562 109.039,69.562 ccw(c109.039,69.358) 108.836,69.358 ccw(c109.039,69.358) 109.039,69.155 110.994,69.155 cw(c110.994,68.596) 111.553,68.596 cw(c110.994,68.596) 110.994,68.038 109.039,68.038 ccw(c109.039,67.834) 108.836,67.834 ccw(c109.039,67.834) 109.039,67.631 110.994,67.631 cw(c110.994,67.072) 111.553,67.072 cw(c110.994,67.072) 110.994,66.514 109.039,66.514 ccw(c109.039,66.31) 108.836,66.31 ccw(c109.039,66.31) 109.039,66.107 110.994,66.107 cw(c110.994,65.548) 111.553,65.548 cw(c110.994,65.548) 110.994,64.99 109.039,64.99 ccw(c109.039,64.786) 108.836,64.786 ccw(c109.039,64.786) 109.039,64.583 110.994,64.583 cw(c110.994,64.025) 111.553,64.025 cw(c110.994,64.024) 110.994,63.466 109.039,63.466 ccw(c109.039,63.263) 108.836,63.263 ccw(c109.039,63.263) 109.039,63.059 110.994,63.059 cw(c110.994,62.501) 111.553,62.501 cw(c110.994,62.501) 110.994,61.942 109.039,61.942 ccw(c109.039,61.739) 108.836,61.739 ccw(c109.039,61.739) 109.039,61.535 110.994,61.535 cw(c110.994,60.977) 111.553,60.977 cw(c110.994,60.977) 110.994,60.418 110.273,60.418 ccw(c110.273,60.215) 110.129,60.071 110.837,59.364 112.176,58.024 112.176,52.823 113.652,51.347 113.652,50.764 113.7,50.715 113.7,50.309 U13.62@113.724,50.285
TXD/RS232: R84.2 U4.30 | length 84.1
  Top Layer w0.203: R84.2@17.388,64.586 17.958,64.016 67.988,64.016 v1(69.469,62.535) ; v1(75.25,46.347) 76.111,47.208 79.146,47.208 79.595,46.759 U4.30@79.595,40.439
  Bottom Layer w0.203: v1(69.469,62.535) 70.383,61.62 70.383,50.598 71.884,49.097 74.212,49.097 75.25,48.059 v1(75.25,46.347)
TXD/RS485: R60.1 U4.20 | length 62.3
  Top Layer w0.203: R60.1@32.885,16.708 v1(36.297,16.708) ; v1(70.612,23.343) 71.78,24.511 71.78,35.047 74.595,37.861 U4.20@74.595,40.439
  Bottom Layer w0.203: v1(36.297,16.708) 36.297,21.892 37.747,23.343 v1(70.612,23.343)
TXD/RS485-2: R62.1 U4.63 | length 47.5
  Top Layer w0.203: R62.1@37.892,66.904 37.892,65.761 38.502,65.151 68.777,65.151 73.595,60.334 U4.63@73.595,51.939
USART1_RX: J3.3 U4.26 | length 8.9
  Top Layer w0.203: U4.26@77.595,40.439 77.595,32.993 J3.3@78.597,31.991
USART1_TX: J3.2 U4.25 | length 8.9
  Top Layer w0.203: J3.2@76.057,31.991 77.094,33.028 U4.25@77.094,40.439
USB_N: D11.1 J6.A7 J6.B7 U4.43 | length 88.8
  Top Layer w0.229: U4.43@82.594,47.439 82.63,47.475 83.365,47.475 83.401,47.511 91.112,47.511 92.629,45.994 92.845,45.778 92.845,35.203 93.053,34.995 95.683,32.365 95.891,32.156 128.206,32.156 131.403,28.96 131.403,8.986 D11.1@131.029,8.612 ; D11.1@130.984,8.612 D11.1@131.029,8.612 ; J6.A7@132.327,5.945 132.327,5.16 132.14,4.972 131.507,4.972 131.327,5.152 J6.B7@131.327,5.945 131.363,5.981 131.363,6.716 131.4,6.752 131.4,7.65 131.403,7.653 131.403,8.193 131.049,8.546 131.049,8.591 D11.1@131.029,8.612
USB_P: D13.1 J6.A6 J6.B6 U4.44 | length 88.7
  Top Layer w0.229: U4.44@82.594,47.939 82.63,47.903 83.365,47.903 83.401,47.867 91.259,47.867 92.984,46.142 93.2,45.926 93.2,35.35 96.038,32.512 128.354,32.512 131.758,29.107 131.758,8.986 D13.1@132.132,8.612 ; J6.A6@131.827,5.945 131.792,5.981 131.792,6.716 131.755,6.752 131.755,7.041 ; D13.1@132.177,8.612 D13.1@132.132,8.612 ; J6.B6@132.827,5.945 132.827,6.819 132.606,7.041 131.755,7.041 ; 131.755,7.041 131.755,7.503 131.758,7.506 131.758,8.193 132.112,8.546 132.112,8.591 D13.1@132.132,8.612
VDD12TX1: C44.2 C45.2 FB4.2 U13.56 U13.59 | length 20.9
  Top Layer w0.254: C44.2@114.603,53.308 v1(114.603,52.747) 115.224,52.126 U13.59@115.224,50.285 ; U13.56@116.724,50.285 116.724,52.23 v1(117.241,52.747) C45.2@117.241,53.308
  Top Layer w0.381: v1(105.305,48.635) FB4.2@106.057,48.635
  Bottom Layer w0.508: v1(105.305,48.635) 109.417,52.747 v1(114.603,52.747) v1(117.241,52.747)
VDD33TXRX1: C39.2 FB1.2 R93.2 R95.2 R98.2 R100.2 R102.2 U13.51 | length 9.7
  Top Layer w0.254: U13.51@119.224,50.285 119.224,50.985 121.496,53.257 C39.2@122.427,53.257 ; R93.2@124.403,77.272 v1(124.403,78.13) ; R95.2@128.569,77.272 v1(128.569,78.13) ; R102.2@130.351,75.844 130.407,75.9 130.407,76.942 R98.2@130.631,77.165 ; R98.2@130.737,77.272 v1(130.737,78.13) ; R100.2@134.903,77.272 v1(134.903,78.13)
  other v1: 128.928,69.187 129.974,69.187
VDD33TXRX2: C40.2 FB2.2 R94.2 R96.2 R99.2 R101.2 R103.2 U13.64 | length 9
  Top Layer w0.203: R103.2@106.912,75.844 106.956,75.889 106.956,76.93 R99.2@107.191,77.165
  Top Layer w0.254: R94.2@100.963,77.272 v1(100.963,78.13) ; R96.2@105.129,77.272 v1(105.129,78.13) ; R99.2@107.298,77.272 v1(107.298,78.13) ; C40.2@110.637,53.511 110.637,52.593 112.724,50.506 U13.64@112.724,50.285 ; R101.2@111.463,77.272 v1(111.463,78.13)
  other v1: 106.475,72.187 106.475,73.254
VDDCR: C47.2 C49.2 C51.2 C53.2 FB4.1 U13.6 U13.24 U13.38 | length 28.9
  Top Layer w0.254: v1(109.127,47.51) 109.502,47.135 U13.6@112.074,47.135 ; C51.2@116.229,39.614 v1(116.229,40.296) U13.24@116.229,41.491 ; U13.38@120.874,44.635 121.806,44.635 121.948,44.777 C53.2@122.037,44.777
  Bottom Layer w0.508: v1(109.127,47.51) 110.001,47.51 111.839,45.672 111.839,42.157 112.525,41.471 116.224,41.471 ; v1@116.224,40.291 116.224,41.471 ; v1(123.269,44.971) 123.251,44.954 122.022,44.954 121.469,44.4 121.469,42.064 120.877,41.471 116.224,41.471
ZERO_CROSS-1: J22.1 LED4.2 U4.21 | length 48.8
  Top Layer w0.203: v1(73.431,23.343) 72.263,24.511 72.263,34.799 75.094,37.63 U4.21@75.094,40.439 ; v1(92.558,24.352) 93.465,25.26 97.498,25.26 98.066,24.692 LED4.2@98.066,23.868 J22.1@98.066,20.312
  Bottom Layer w0.203: v1(73.431,23.343) 91.548,23.343 v1(92.558,24.352)
ZERO_CROSS-2: J23.1 LED5.2 U4.27 | length 49
  Top Layer w0.203: v1(92.558,25.264) 93.068,25.775 105.873,25.775 106.663,24.985 LED5.2@106.663,23.833 J23.1@106.663,20.277
  Top Layer w0.229: U4.27@78.094,40.439 78.094,38.405 82.584,33.916 82.584,26.145 v1(81.61,25.171)
  Bottom Layer w0.203: v1(81.61,25.171) 82.919,23.863 91.157,23.863 v1(92.558,25.264)
ZERO_CROSS-3: J25.1 LED6.2 U4.28 | length 57.3
  Top Layer w0.203: v1(92.558,26.825) 93.068,26.314 114.605,26.314 115.37,25.55 LED6.2@115.37,23.833 J25.1@115.37,20.277
  Top Layer w0.229: U4.28@78.595,40.439 78.595,38.714 83.156,34.153 83.156,25.743 82.592,25.179 v1(82.584,25.179)
  Bottom Layer w0.203: v1(82.584,25.179) 82.584,25.171 83.285,24.471 90.203,24.471 v1(92.558,26.825)
ZERO_CROSS-4: J28.1 LED7.2 U4.29 | length 64.8
  Top Layer w0.203: v1(92.558,27.737) 93.469,26.825 122.984,26.825 123.833,25.976 LED7.2@123.833,23.833 J28.1@123.833,20.277
  Top Layer w0.229: U4.29@79.094,40.439 79.094,38.939 83.669,34.365 v1(83.669,25.171)
  Bottom Layer w0.203: v1(83.669,25.171) 89.992,25.171 v1(92.558,27.737)
pads on no net: J2. J6.A8 J6.B8 J6.MH J13. J13.1 J13.2 J13.3 J13.6 J14. J14.1 J14.2 J14.3 J14.6 J18.7 J18.11 J18.12 J18.MH1 J18.MH2 J19.7 J19.11 J19.12 J19.MH1 J19.MH2 U3.3 U3.8 U3.13 U3.18 U5.3 U5.8 U5.13 U5.18 U7.3 U7.8 U7.13 U7.18 U12.11 U12.12 U12.13 U12.14 U13.3 U13.12 U13.15 U13.16 U13.21 U13.22 U13.23 U13.25 U13.26 U13.27 U13.28 U13.29 U13.30 U13.31 U13.33 U13.35 U13.36 U13.39 U13.40 U13.49

## Polygon pours and split planes (outlines as drawn)
GND on Top Layer "GND_L01_P005" (solid, remove dead copper, pour order 5): 0,0 0,100 150,100 150,0
NetC6_1 on Top Layer "NETC6_1_L01_P003" (solid, pour order 3): 19.882,43.038 17.896,43.038 17.699,43.236 17.699,44.741 17.099,44.741 17.099,43.231 16.231,42.363 16.231,35.687 19.882,35.687
VDD33TXRX1 on Top Layer "VDD33TXRX1_L01_P002" (solid, pour order 2): 130.607,69.748 128.828,69.748 123.038,63.958 123.038,57.395 121.897,56.254 121.897,52.94 122.656,52.94 122.656,55.564 124.333,57.241 124.333,63.348 129.61,68.625 130.607,68.625
VDD33TXRX2 on Top Layer "VDD33TXRX2_L01_P001" (solid, pour order 1): 111.167,52.94 111.167,56.321 107.137,60.35 107.137,73.744 105.74,73.744 105.74,59.766 110.408,55.098 110.408,52.94
NetFB5_1 on Top Layer "NETFB5_1_L01_P000" (solid, pour order 0): 135.577,8.936 135.577,7.623 134.777,6.823 134.777,6.248 134.777,3.561 134.239,3.023 129.887,3.023 129.377,3.533 129.377,7.668 129.977,7.668 129.977,4.875 130.477,4.375 133.846,4.375 134.177,4.707 134.177,8.936
GND on Layer 1 "GND_L02_P009" (solid, remove dead copper, pour order 9): 0,0 0,100 150,100 150,0
"CHASIS GND" on Layer 1 "CHASIS_GND_L02_P004" (solid, pour order 4): 124.663,78.765 124.663,83.82 141.326,83.82 141.326,8.788 0,8.788 0,0 150,0 150,100 0,100 0,89.764 92.939,89.764 92.939,78.765
+3V3 on Layer 2 "+3V3_L03_P007" (solid, remove dead copper, pour order 7): 0,0 0,100 150,100 150,0
+5V on Layer 2 "+5V_L03_P006" (solid, pour order 6): 50.8,73.302 50.8,68.453 56.134,68.453 56.134,70.231 54.528,70.231 53.966,69.669 52.807,69.669 52.807,73.302 78.813,73.302 78.813,69.999 78.791,69.977 74.824,69.977 74.824,68.377 82.22,68.377 82.22,77.826 11.963,77.826 11.963,0 28.092,0 137.338,0 137.338,10.973 25.933,10.973 25.933,20.125 25.933,38.532 28.092,40.691 28.092,65.1 25.629,65.1 25.629,73.302
GND on Bottom Layer "GND_L04_P008" (solid, remove dead copper, pour order 8): 0,0 0,100 150,100 150,0

## Other copper
Top Layer:
  rectangle net GND: 53.746,70.263 54.864,71.539
  rectangle net GND: 75.156,70.238 76.274,71.514
  rectangle net GND: 68.181,45.785 70.24,46.284
  rectangle net GND: 68.181,45.621 69.034,46.284
  rectangle net GND: 68.399,45.789 71.695,46.089
  rectangle net +3V3: 43.445,34.971 45.611,36.962
  rectangle net +3V3: 43.445,36.083 44.145,37.383
  rectangle net +3V3: 32.487,35.687 35.255,41.199
  rectangle net +5V: 24.917,35.687 27.887,45.568
  rectangle net +5V: 21.615,35.687 29.387,41.199
  rectangle net +24V: 12.522,45.949 17.699,54.159
  region net RE/DE/RS485/T: 31.058,18.426 31.058,19.376 30.458,19.376 30.458,18.426
  region net +3V3: 28.258,14.396 28.258,18.076 27.658,18.076 27.658,14.396
  rectangle net RE/DE/RS485/T-2: 39.61,68.731 40.56,69.331
  rectangle net +3V3: 35.58,71.531 39.26,72.131
  rectangle net NetC23_2: 135.966,3.964 136.852,6.034
  rectangle net NetC23_2: 135.966,3.964 139.805,4.865
  rectangle net NetFB5_2: 136.219,8.136 136.977,10.022
  rectangle net NetFB5_1: 134.177,8.136 135.577,8.936
  rectangle net RE/DE/RS485/T: 30.458,18.426 31.058,19.376
  rectangle net VDDCR: 121.72,44.548 123.574,45.006
  rectangle net VDDCR: 122.936,44.548 123.574,45.281
  rectangle net VDD33TXRX1: 121.897,52.94 122.656,54.747
  rectangle net +3V3: 131.112,43.961 133.086,46.567
  rectangle net +3V3: 72.007,46.289 72.73,47.589
  rectangle net +3V3: 70.495,46.289 72.73,46.589
  rectangle net NetC22_2: 65.586,45.839 67.873,47.089
  rectangle net +3V3: 65.586,48.639 67.878,49.853
  rectangle net +3V3: 66.227,47.289 67.878,49.853
  rectangle net +3V3: 68.399,47.289 72.73,47.589
  rectangle net +3V3: 67.274,47.289 69.034,47.916
  rectangle net NetC22_2: 65.586,46.561 69.034,47.089
  rectangle net NetC22_2: 68.399,46.789 71.695,47.089
  rectangle net +5V: 76.474,69.368 77.073,71.514
  rectangle net +5V: 76.615,70.879 76.954,72.786
  rectangle net +5V: 75.704,69.368 77.073,69.97
  rectangle net +5V: 55.062,69.368 55.66,71.514
  rectangle net +5V: 55.203,70.879 55.541,72.786
  rectangle net +5V: 54.292,69.368 55.66,69.97
  rectangle net NetJ9_2: 80.575,73.85 81.431,74.739
  rectangle net NetJ11_2: 59.138,73.85 59.993,74.739
  rectangle net +24V: 7.29,49.733 29.794,54.159
  rectangle net NetD22_2: 0.381,54.642 10.77,62.179
  rectangle net NetD22_2: 0.381,53.696 6.274,62.179
  rectangle net NetD1_2: 0.381,32.969 6.274,50.546
  rectangle net NetD1_2: 0.381,32.969 14.713,40.64
  region net +3V3: 80.091,18.933 80.091,15.765 80.619,15.765 80.619,18.933
  rectangle net NetFB5_1: 129.377,5.345 129.977,7.62
  rectangle net NetFB5_1: 134.177,5.345 134.777,8.936
  rectangle net +3V3: 24.548,65.354 26.796,68.451
  region net +3V3: 43.509,18.477 43.509,15.309 44.036,15.309 44.036,18.477
  region net +3V3: 43.509,18.478 43.509,17.843 45.665,17.843 45.665,18.478
  rectangle net VDDCR: 107.157,48.235 108.626,49.035
  rectangle net VDDCR: 108.093,47.193 108.626,49.036
  rectangle net VDDCR: 108.093,47.193 109.44,47.828
  rectangle net +3V3: 108.169,46.193 109.137,46.94
  rectangle net VDD33TXRX2: 112.499,49.935 112.849,50.713
  rectangle net VDD33TXRX2: 110.408,52.94 111.167,54.747
  rectangle net +3V3: 109.985,47.467 111.413,48.139
  region net +3V3: 80.091,18.934 80.091,18.299 82.247,18.299 82.247,18.934
  region net +3V3: 51.593,34.479 51.593,35.706 50.923,35.706 50.923,34.479
  region net +3V3: 51.527,34.492 51.527,37.648 51.098,37.648 51.098,34.492
  region net +3V3: 51.593,34.479 51.593,35.114 49.437,35.114 49.437,34.479
  region net "CHASIS GND": 149.945,1.323 149.945,4.63 ccw(c149.818,4.63) 149.875,4.744 ccw(c149.764,4.688) 149.864,4.763 ccw(c147.176,2.754) 143.822,2.754 ccw(c147.176,2.754) 145.147,0.083 ccw(c145.224,0.185) 145.224,0.057 149.945,0.057
  region net "CHASIS GND": 149.945,98.677 149.945,95.37 cw(c149.818,95.37) 149.875,95.256 cw(c149.764,95.312) 149.864,95.237 cw(c147.176,97.246) 143.822,97.246 cw(c147.176,97.246) 145.147,99.917 cw(c145.224,99.816) 145.224,99.943 149.945,99.943
  region net "CHASIS GND": 0.055,98.677 0.055,95.37 ccw(c0.182,95.37) 0.125,95.256 ccw(c0.236,95.312) 0.137,95.237 ccw(c2.824,97.246) 6.178,97.246 ccw(c2.824,97.246) 4.854,99.917 ccw(c4.777,99.816) 4.776,99.943 0.055,99.943
  region net "CHASIS GND": 0.055,1.323 0.055,4.63 cw(c0.182,4.63) 0.125,4.744 cw(c0.236,4.688) 0.137,4.763 cw(c2.824,2.754) 6.178,2.754 cw(c2.824,2.754) 4.854,0.083 cw(c4.777,0.185) 4.776,0.057 0.055,0.057
  pour cut-out: 110.185,57.557 110.185,60.421 122.955,60.421 122.955,57.557
  pour cut-out: 135.781,99.989 135.781,74.066 96.344,74.066 96.344,99.989
  pour cut-out: 6.274,50.546 7.29,50.546 7.29,49.352 6.274,49.352
  pour cut-out: 24.206,41.199 24.206,41.605 19.888,41.605 19.888,35.693 19.882,35.687 16.637,35.687 16.637,34.874 24.232,34.874 24.232,35.687 21.615,35.687 21.615,41.199
Layer 1:
  rectangle net "CHASIS GND": 0.393,78.497 9.169,93.624
Layer 2:
  pour cut-out: 100.838,58.115 100.838,68.618 104.369,68.618 104.369,58.115
  pour cut-out: 6.895,33.274 6.895,37.435 9.677,37.435 9.677,33.274
  pour cut-out: 23.901,51.371 23.901,54.496 25.476,54.496 25.476,51.371
  pour cut-out: 17.475,51.371 17.475,54.496 19.05,54.496 19.05,51.371
  pour cut-out: 12.852,51.371 12.852,54.496 14.427,54.496 14.427,51.371
  pour cut-out: 0,62.225 6.299,62.225 6.299,42.113 0,42.113
Bottom Layer:
  rectangle net +3V3: 32.487,35.687 35.255,41.199
  rectangle net +5V: 24.917,41.783 27.889,45.568
  rectangle net VDD33TXRX1: 128.397,68.625 130.601,69.748
  rectangle net VDD33TXRX1: 129.153,68.625 130.601,78.486
  rectangle net VDD33TXRX1: 123.997,77.546 135.224,78.689
  rectangle net VDD33TXRX2: 105.713,71.755 107.161,78.486
  rectangle net VDD33TXRX2: 100.557,77.546 111.784,78.689
  rectangle net +24V: 13.157,49.733 29.794,54.159
  rectangle net NetD22_2: 0.381,53.696 6.325,62.179
  rectangle net NetD1_2: 0.381,32.969 6.274,50.546
  rectangle net NetD1_2: 0.381,32.969 9.677,40.64
  rectangle net NetFB5_1: 131.191,3.023 132.992,7.668
  rectangle net NetFB5_1: 129.187,6.375 134.967,7.668
  pour cut-out: 96.353,99.989 96.353,78.6 96.341,78.588 135.787,78.588 135.787,99.989 96.349,99.989

## Silkscreen, mask and mechanical layers (free items; w line width, h text height)
Top Overlay:
  lines w0.127: 0.779,63.5 3.015,63.5 3.015,64.719 0.779,64.719 0.779,63.5
  text "CHASIS GND" at 0.482,90.292 h1.52
  text "RS-232" at 27.276,89.791 h1.52 r90
  text "RS-485" at 46.682,89.791 h1.52 r90
  text "RX" at 16.974,88.496 h1.5
  text "TX" at 22.094,88.496 h1.5
  text "B" at 36.859,88.496 h1.5
  text "A" at 41.859,88.496 h1.5
  text "CAN OUT" at 68.317,88.494 h1.52 r90
  text "CAN IN" at 89.73,88.494 h1.52 r90
  text "ETHERCAT OUT" at 96.003,88.494 h1.52 r90
  text "ETHERCAT IN" at 119.443,88.494 h1.52 r90
  text "GND" at 5.186,76.158 h1.52
  text "+3V3" at 0.168,72.319 h1.52
  text "+5V" at 0.143,68.763 h1.52
  text "+24V" at 0.143,64.877 h1.52
  text "PWM 04" at 143.932,55.095 h1.5 r90
  text "GND" at 94.182,50.682 h1 r90
  text "+3V3" at 86.558,50.544 h1 r90
  text "SW-CLK/BOOT0" at 89.368,45.474 h1 r90
  text "SW-DIO" at 91.908,45.474 h1 r90
  text "PWM 01" at 143.932,39.477 h1.5 r90
  text "+24V" at 10.086,36.68 h1.5 r270
  text "GND" at 10.089,31.467 h1.5 r270
  text "GND" at 81.457,28.457 h1 r90
  text "+3V3" at 73.833,28.319 h1 r90
  text "USART1-RX" at 78.917,25.307 h1 r90
  text "USART1-TX" at 76.643,25.038 h1 r90
  text "Zero Cross Inputs" at 95.534,24.64 h1.5
  text "RS-485" at 0.04,23.978 h1.52
  text "PWM 02" at 143.932,23.858 h1.5 r90
  text "A" at 10.333,21.638 h1.5 r270
  text "B" at 10.333,16.478 h1.5 r270
  text "ZC1" at 95.471,15.075 h1.5
  text "GND" at 99.737,15.075 h1.5
  text "ZC2" at 104.069,15.04 h1.5
  text "GND" at 108.334,15.04 h1.5
  text "ZC3" at 112.771,15.04 h1.5
  text "GND" at 117.041,15.04 h1.5
  text "ZC4" at 121.246,15.04 h1.5
  text "GND" at 125.505,15.04 h1.5
  text "PWM 03" at 143.932,8.24 h1.5 r90
  text "SCL" at 75.004,6.157 h1.5
  text "SDA" at 78.494,6.157 h1.5
  text "GND" at 81.939,6.157 h1.5
  text "OUTPUT 03" at 28.118,6.081 h1.5
  text "OUTPUT 04" at 43.782,6.081 h1.5
  text "OUTPUT 01" at 59.446,6.081 h1.5
  text "OUTPUT 02" at 85.855,6.081 h1.5
  text "PB15" at 110.513,3.062 h1.52 r90
  text "PB14" at 107.982,3.057 h1.52 r90
  text "PB13" at 105.705,2.817 h1.52 r90
  text "PA8" at 113.325,2.817 h1.52 r90
  text "PC6" at 115.871,2.823 h1.52 r90
  text "PC7" at 118.411,2.817 h1.52 r90
  text "PD8" at 120.945,2.817 h1.52 r90
  text "PD9" at 123.485,2.815 h1.52 r90
Bottom Overlay:
  text "REV-v1.0" at 146.142,75.847 h2 r270
  text "DRIVER MAIN BOARD" at 90.191,9.165 h2
Board Outline:
  the board outline again, w0.254

## Text inside footprints (layer, text, board x,y; h text height)
J2: Top Overlay "1" at 2.215,44.037 h0.8 r90
J6: Mechanical 13 "PCB Edge" at 130.739,0.572 h0.8
J13: Top Overlay "1" at 73.84,92.56 h1 r180
J14: Top Overlay "1" at 52.427,92.56 h1 r180
SW2: Top Overlay "ON" at 48.121,54.28 h0.76; Top Overlay "1" at 48.933,50.437 h0.9 r180; Top Overlay "2" at 51.448,50.463 h0.9 r180; Top Overlay "3" at 53.937,50.488 h0.9 r180